# Altium PCB SW.pcbdoc
Units mil, origin at the board's own origin, x right, y up, seen from the top; angles counter-clockwise.
Board outline 3937 x 393.7 mil, 2 copper layers (Top Layer, Bottom Layer), stack 62.2 mil thick; 5 components, 5 nets, 25 pads, 0 vias.
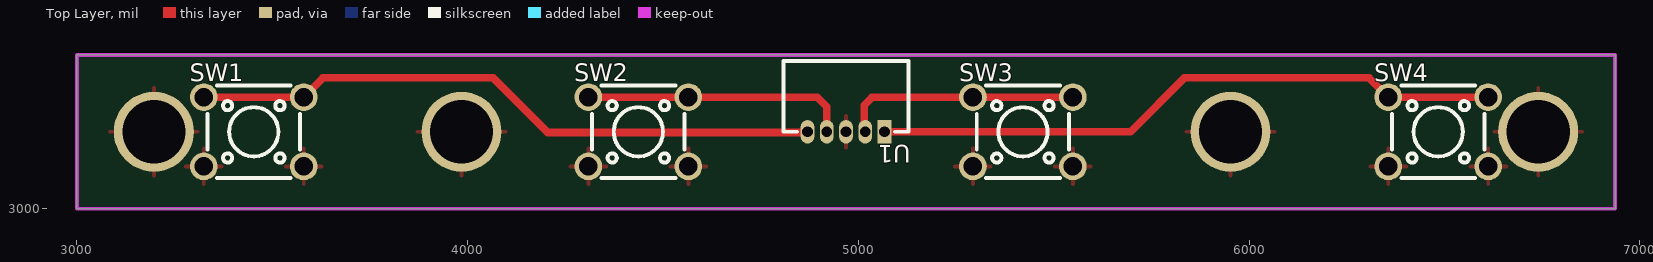
[diagram p0: Top Layer view]
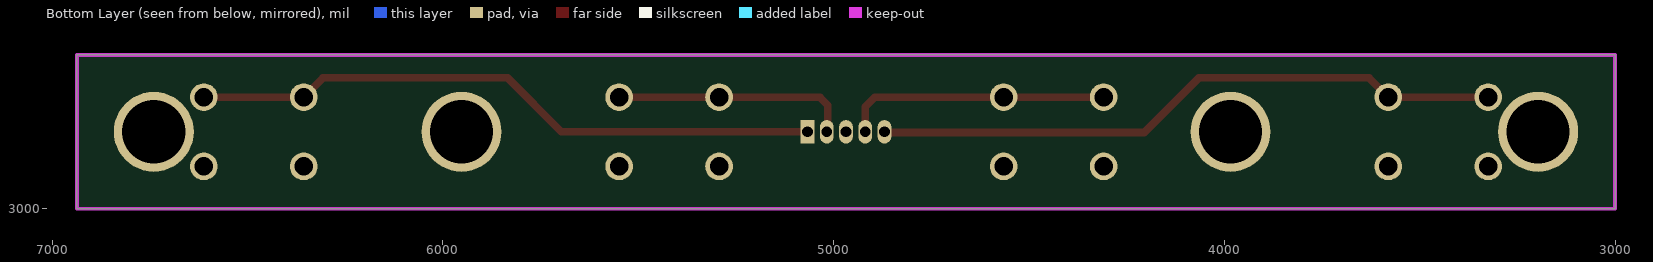
[diagram p1: Bottom Layer view, seen from below]

## Layer stack, top to bottom
Top Solder Mask Layer: solder mask 0.4, Dk 3.3
Top Layer: signal copper 1.4
Dielectric1: surface 59.4, FR4, Dk 4.5
Bottom Layer: signal copper 1.4
Bottom Solder Mask Layer: solder mask 0.4, Dk 3.3

## Board outline
3000,3393.7 3000,3000 6937,3000 6937,3393.7

## Design rules (kind name [scope] priority, off if disabled: settings)
BoardOutlineClearance copperThickness1oz [All] p0: genericclearance=10 ignorepadtopadclearanceinfootprint=FALSE except(0: Arc-SplitContinuation Track-SplitContinuation SMDPad-SplitContinuation THPad-SplitContinuation Via-SplitContinuation Fill-SplitContinuation Poly-SplitContinuation Region-SplitContinuation Text-SplitContinuation)
BoardOutlineClearance copperThickness2oz [All] p0: genericclearance=10 ignorepadtopadclearanceinfootprint=FALSE except(0: Arc-SplitContinuation Track-SplitContinuation SMDPad-SplitContinuation THPad-SplitContinuation Via-SplitContinuation Fill-SplitContinuation Poly-SplitContinuation Region-SplitContinuation Text-SplitContinuation)
BoardOutlineClearance otherClearance [All] p0: genericclearance=10 ignorepadtopadclearanceinfootprint=FALSE except(0: Arc-SplitContinuation Track-SplitContinuation SMDPad-SplitContinuation THPad-SplitContinuation Via-SplitContinuation Fill-SplitContinuation Poly-SplitContinuation Region-SplitContinuation Text-SplitContinuation)
Clearance copperThickness1oz [All] p1: gap=7 ignorepadtopadclearanceinfootprint=FALSE
Clearance copperThickness2oz [All] p1: gap=7 ignorepadtopadclearanceinfootprint=FALSE
Clearance otherClearance [All] p1: gap=7 ignorepadtopadclearanceinfootprint=FALSE
DiffPairsRouting differentialPair [All] p1: maxuncoupledlength=10 minlimit=6 maxlimit=Infinity mostfreqgap=6 toplayer_minwidth=5 toplayer_prefwidth=10 toplayer_maxwidth=100 bottomlayer_minwidth=5 bottomlayer_prefwidth=10 bottomlayer_maxwidth=100
PasteMaskExpansion pasteMaskExpansion [All] p1: expansion=0
PlaneConnect innerPlane [All] p1: planeconnectstyle=Relief reliefexpansion=20 reliefentries=4 reliefconductorwidth=10 reliefairgap=10
PolygonConnect copperRegion [All] p1: connectstyle=Relief reliefentries=4 reliefconductorwidth=10 polygonreliefangle="90 Angle" airgapwidth=10
RoutingVias viaSize [All] p1: viastyle="Through Hole" holewidth=12.0078 minholewidth=11.811 maxholewidth=248.0314 width=12.0078 minwidth=11.811 maxwidth=248.0314
SolderMaskExpansion solderMaskExpansion [IsVia] p1: useseparateexpansions=TRUE expansion=-1000 expansionbottom=-1000
SolderMaskExpansion solderMaskExpansion [All] p2: useseparateexpansions=TRUE expansion=2 expansionbottom=2
Width copperThickness1oz [All] p1: maxlimit=100 minlimit=5 preferedwidth=10
Width copperThickness2oz [All] p1: maxlimit=100 minlimit=8 preferedwidth=10

## Components (designator, comment, footprint, x,y, rotation, side; value= is the part's Value field where it differs from the comment)
SW1 "TS665CJ" SW-TH_4P-L6.0-W6.0-P4.50-LS6.5#1 3452.8,3196.9 r0 top
SW2 "TS665CJ" SW-TH_4P-L6.0-W6.0-P4.50-LS6.5#2 4437,3196.9 r0 top
SW3 "TS665CJ" SW-TH_4P-L6.0-W6.0-P4.50-LS6.5#1 5421.3,3196.9 r0 top
SW4 "TS665CJ" SW-TH_4P-L6.0-W6.0-P4.50-LS6.5#1 6484.3,3196.9 r0 top
U1 "BX-MX1.25-5PWZ" CONN-TH_5P-P1.25_BX-MX1.25-5PWZ 4968.5,3196.9 r180 top

## Footprints (in the part's own frame and the unit in brackets; to place one, negate y for a bottom-side part, rotate by r counter-clockwise, add the part's x,y. Pads: shape width x height; smd on the part's side, far side on the other; paste and mask are expansions set on the pad)
CONN-TH_5P-P1.25_BX-MX1.25-5PWZ [mil]
  rect 35.4x60 hole 27.6: 1(-98.4,0)
  oval 35.4x60 hole 27.6: 2(-49.2,0) 3(0,0) 4(49.2,0) 5(98.4,0)
  silkscreen extent -160,-181 160,0
SW-TH_4P-L6.0-W6.0-P4.50-LS6.5#1 [mil]
  round 70.9 hole 47.2: 1(-128,88.5) 2(127.9,88.5) 3(-128,-88.6) 4(127.9,-88.6)
  silkscreen extent -118,-118 118,118
SW-TH_4P-L6.0-W6.0-P4.50-LS6.5#2 [mil]
  round 70.9 hole 47.2: 1(-127.9,88.5) 2(128,88.5) 3(-127.9,-88.6) 4(128,-88.6)
  silkscreen extent -118,-118 118,118

## Free pads (board coordinates)
  round 204.7 hole 161.4: 1(3196.9,3196.9) 1(3984.3,3196.9) 1(5952.8,3196.9) 1(6740.2,3196.9)

## Nets (pads, with @x,y where several pads share a name; then routed paths per layer and width w, separated by ;. In a path a pad name is that pad's centre, name@x,y a point inside that pad or via, vN(x,y) a via of type N, cw(c..) or ccw(c..) an arc to the next point about the centre after c; other vN are vias at no path point)
GND: pad.1 SW1.3 SW1.4 SW2.3 SW2.4 SW3.3 SW3.4 SW4.3 SW4.4 U1.3
SW1: SW1.1 SW1.2 U1.5 | length 1624.6
  Top Layer w20: SW1.1 SW1.2 3630.3,3335 4065,3335 4205,3195 4868.2,3195 U1.5
SW2: SW2.1 SW2.2 U1.4 | length 684.2
  Top Layer w20: SW2.1 SW2.2 4894.6,3285.4 4919.3,3260.7 U1.4
SW3: SW3.1 SW3.2 U1.2 | length 611.9
  Top Layer w20: U1.2 5015,3199.6 5015,3265 5035.4,3285.4 SW3.1 SW3.2
SW4: SW4.1 SW4.2 U1.1 | length 1623
  Top Layer w20: U1.1 5696.9,3196.9 5835,3335 6306.7,3335 SW4.1 SW4.2

## Polygon pours and split planes (outlines as drawn)
GND on Top Layer (solid, remove dead copper, pour order 0): 3000,3393.7 3000,3000 6937,3000 6937,3393.7

## Keep-outs
Board Outline Layer:
  the board outline again, w10